# Altium PCB PCB1.PcbDoc
Units mm, origin at the board's own origin, x right, y up, seen from the top; angles counter-clockwise.
Board outline 73.75 x 80.25 mm, 2 copper layers (Top Layer, Bottom Layer); 20 components, 17 nets, 85 pads, 0 vias.
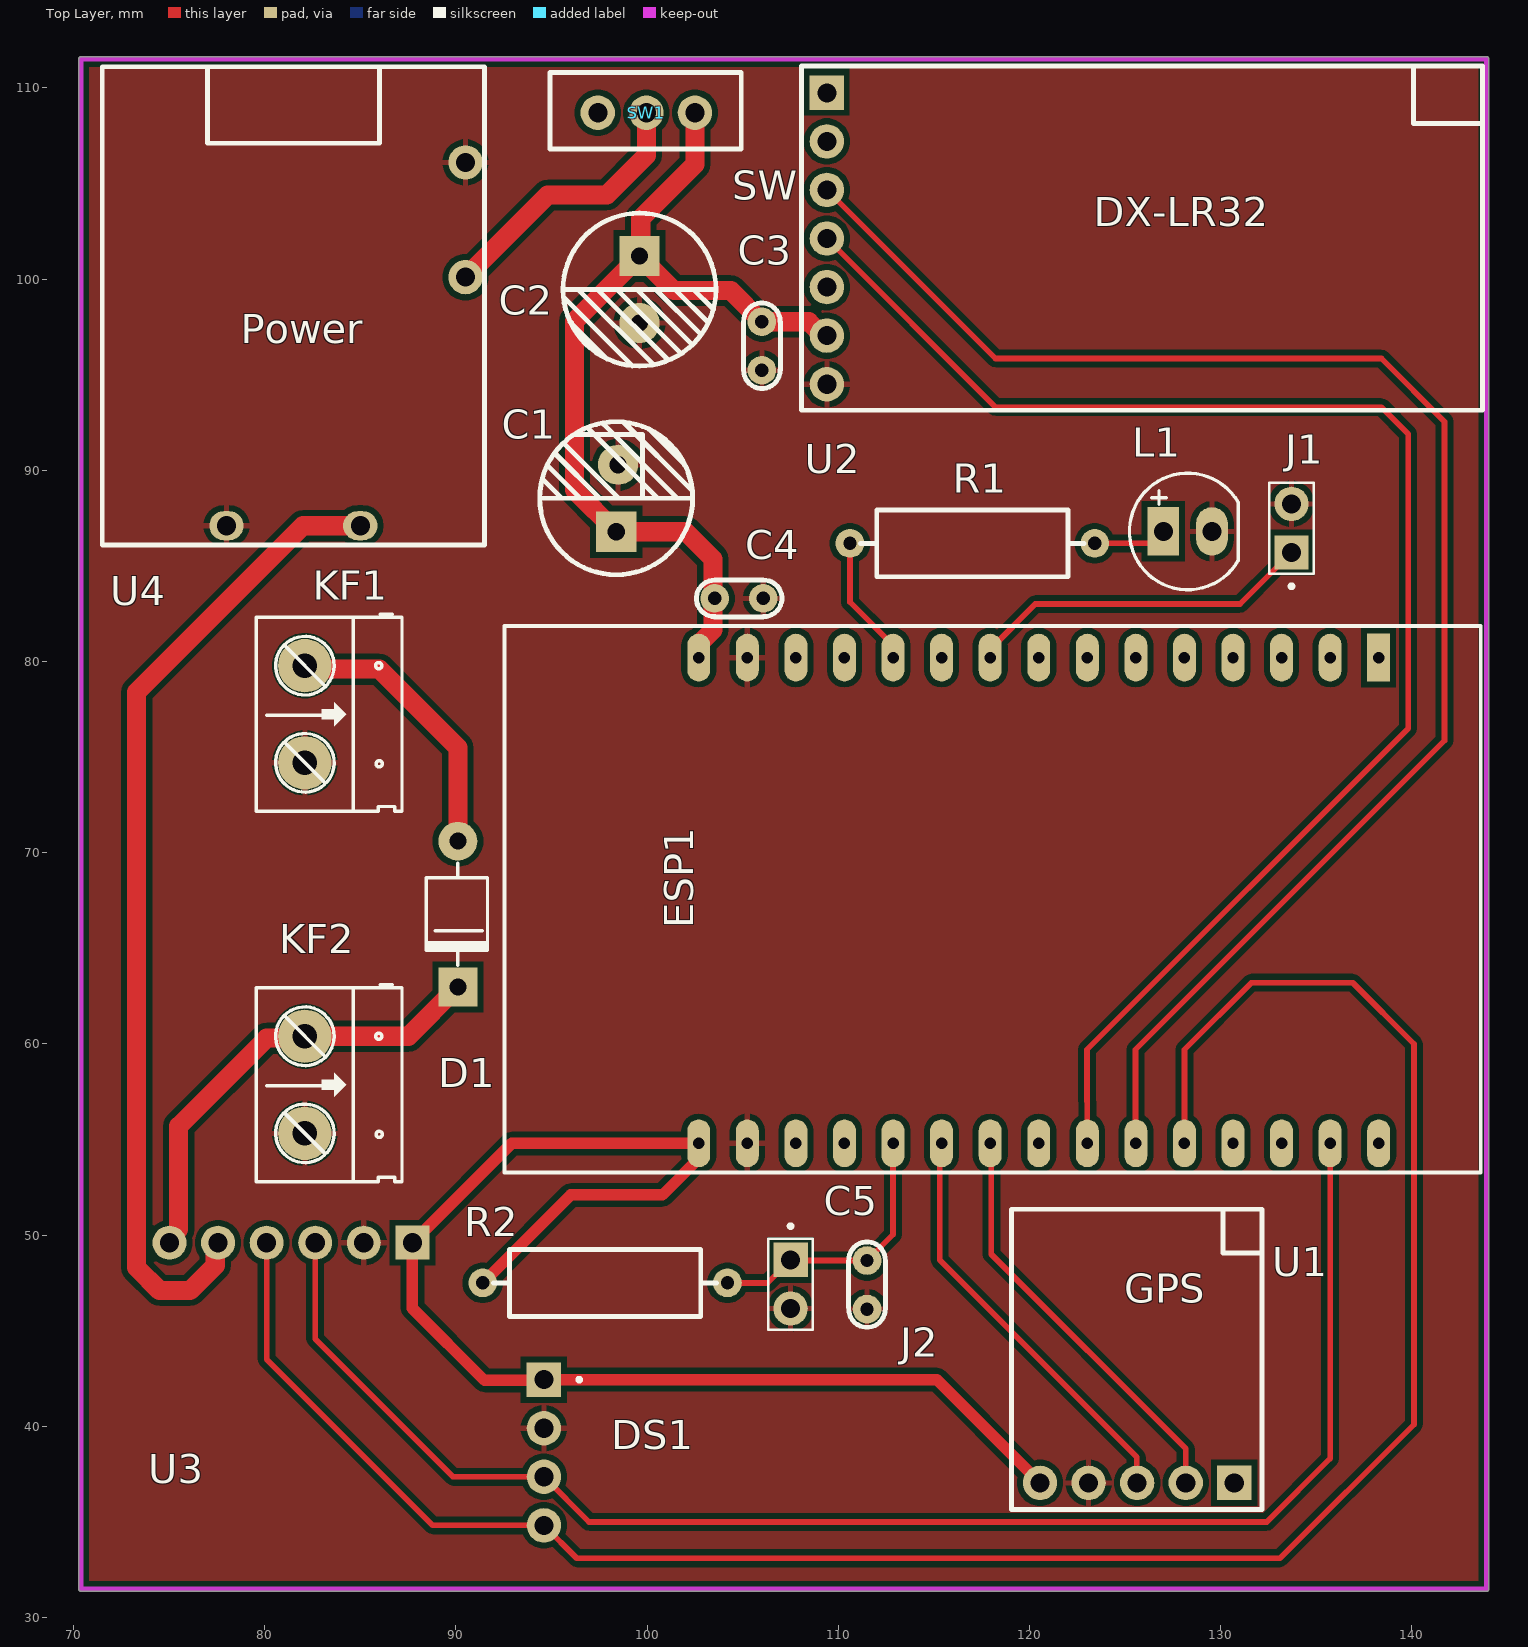
[diagram p0: Top Layer view]
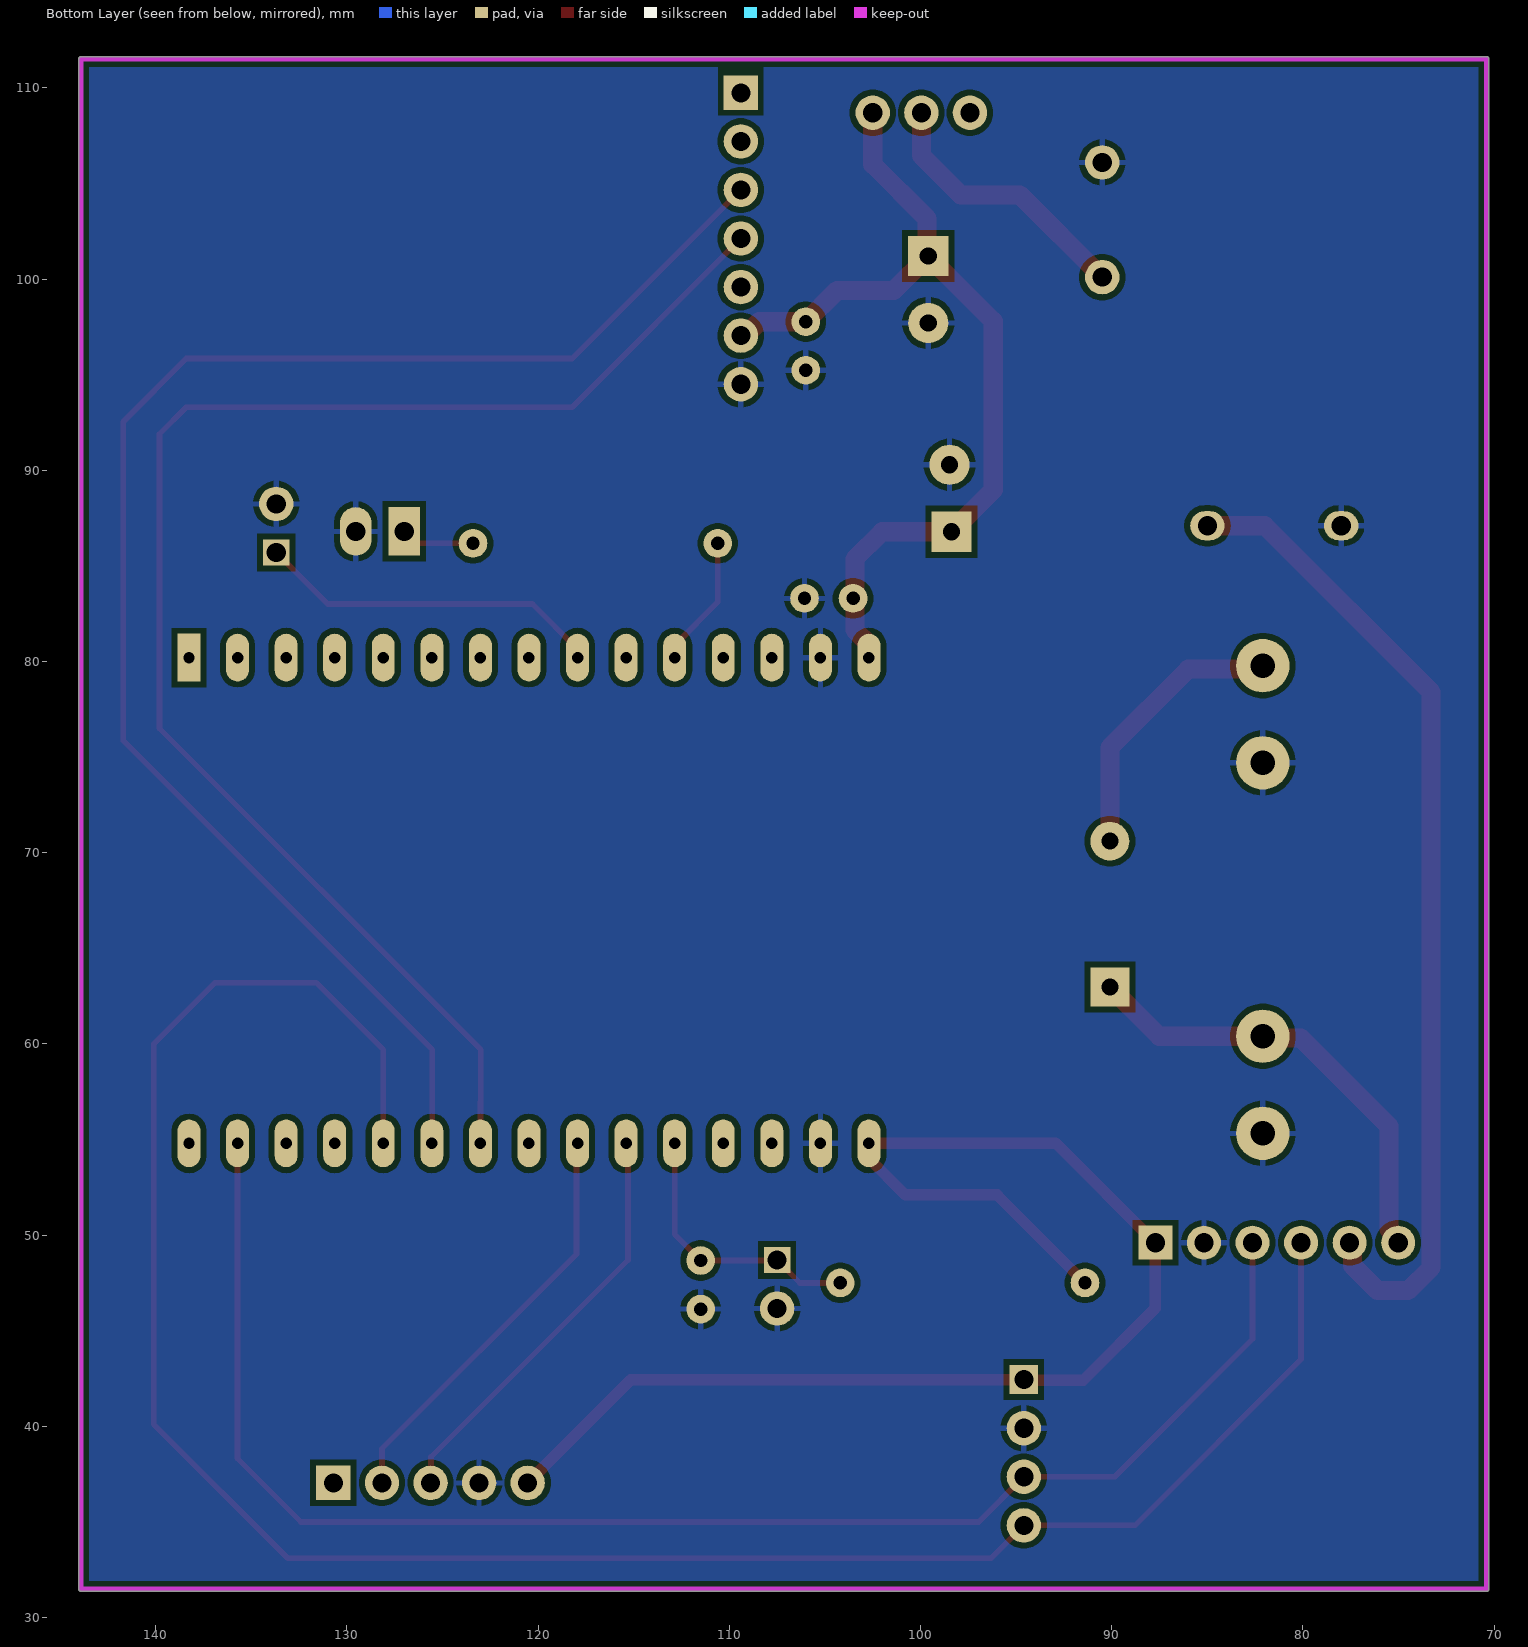
[diagram p1: Bottom Layer view, seen from below]
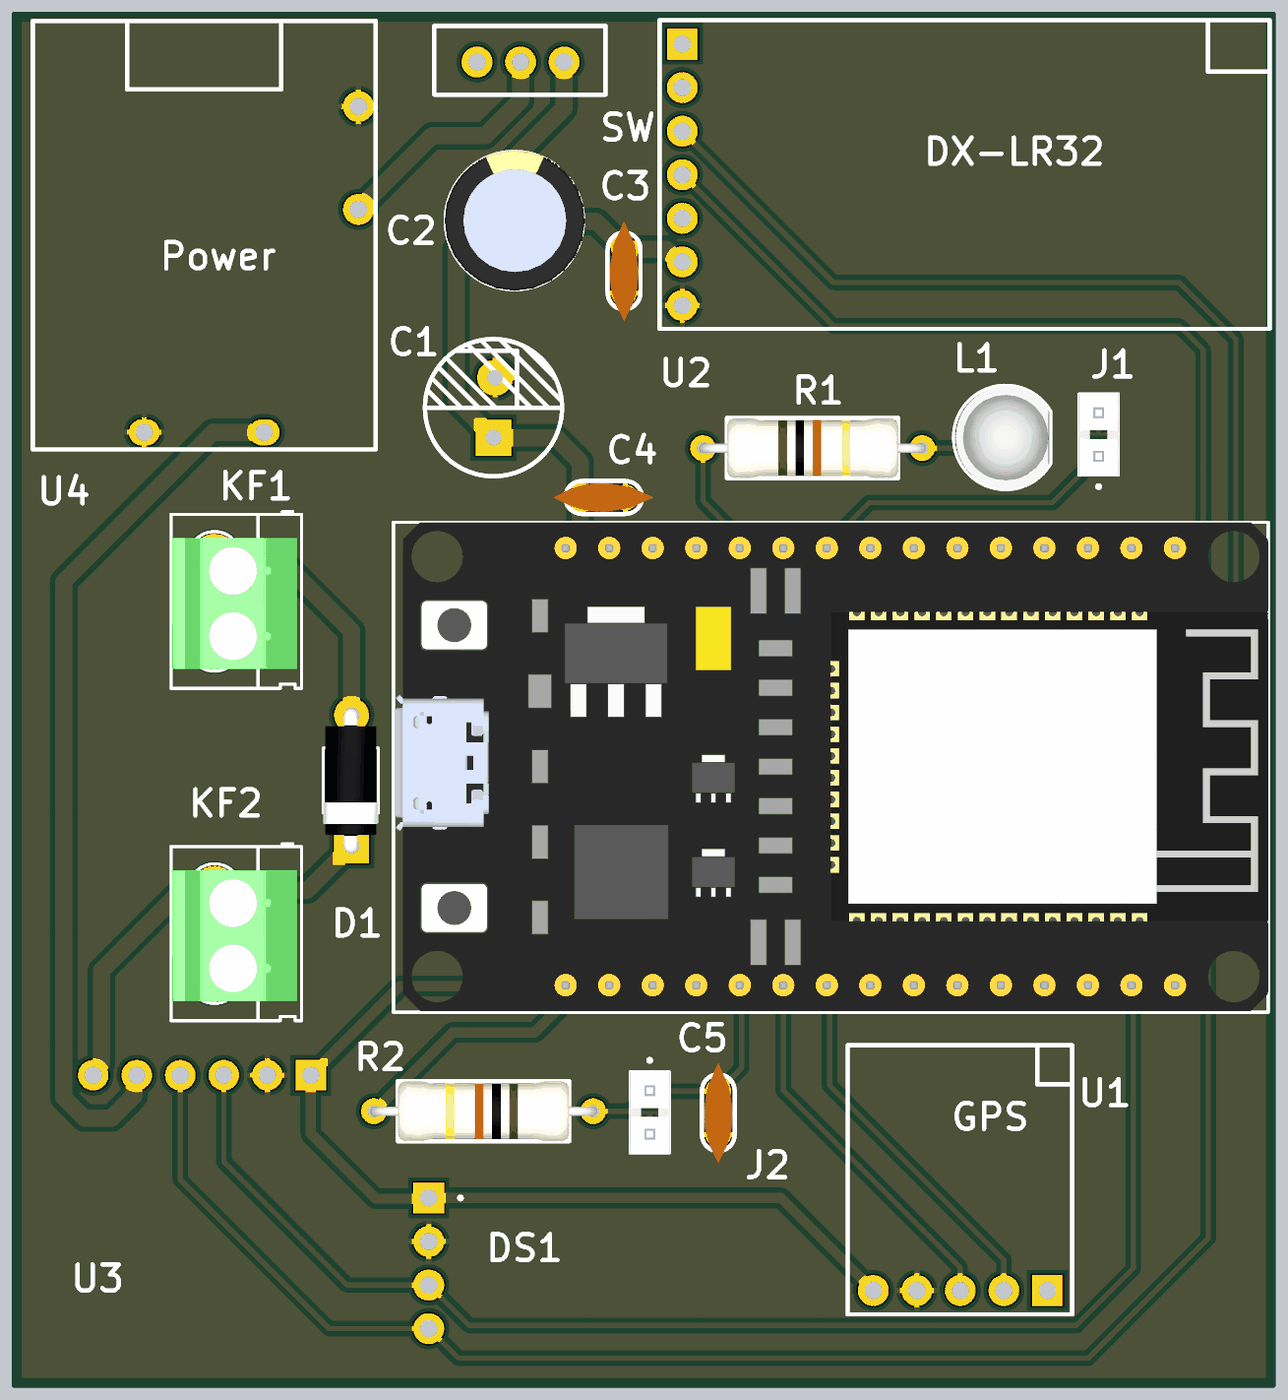
[diagram p2: 3D render of the assembled board from above, using the file's embedded part models]

## Layer stack, top to bottom
Top Solder: solder mask 0.0102, Solder Resist, Dk 3.5
Top Layer: signal copper 0.0356
Dielectric 1: dielectric 0.32, FR-4, Dk 4.8
Bottom Layer: signal copper 0.0356
Bottom Solder: solder mask 0.0102, Solder Resist, Dk 3.5

## Board outline
70.273,31.5 ccw(c70.4,31.5) 70.4,31.373 143.9,31.373 ccw(c143.9,31.5) 144.027,31.5 144.027,111.5 ccw(c143.9,111.5) 143.9,111.627 70.4,111.627 ccw(c70.4,111.5) 70.273,111.5

## Design rules (kind name [scope] priority, off if disabled: settings)
Clearance [All] p1: gap=0.3 ignorepadtopadclearanceinfootprint=FALSE
PolygonConnect [All] p1: connectstyle=Relief reliefconductorwidth=0.3 reliefentries=4 polygonreliefangle="90 Angle" airgapwidth=0.3
RoutingVias [All] p1: holewidth=0.4 width=0.8 viastyle="Through Hole" minholewidth=0.4 minwidth=0.8 maxholewidth=0.4 maxwidth=0.8
SolderMaskExpansion [All] p1: expansion=0.102 istentingtop=FALSE
Width [All] p1: maxlimit=1 minlimit=0.3 preferedwidth=0.6
30 further rules are at their usual default settings.

## Components (designator, comment, footprint, x,y, rotation, side; value= is the part's Value field where it differs from the comment)
C1 "470uF" "tu hoa 8mm"#1 98.381,88.537 r90 top
C2 "470uF" "tu hoa 8mm"#2 99.6,99.45 r270 top
C3 "104" "tu gom" 106,96.5 r270 top
C4 "104" "tu gom" 104.8,83.3 r180 top
C5 "104" "tu gom" 111.5,47.4 r270 top
D1 "1N5822" "DIODE 1A" 90.1,71.87 r90 top
DS1 "OLED_128X64_1.3_I2C" LCD_OLED_128X64_1.3_I2C 79.05,38.63 r270 top
ESP1 "ESP32 DEVKIT" "ESP32 WROOM 32 KIT" 138.26,80.2 r270 top
J1 "BUZZER" TE_3-644456-2 133.7,85.7 r90 top
J2 "BUTTON" TE_3-644456-2 107.5,48.7 r270 top
KF1 "Solar" "Con 2 KF301 5.08" 82.1,79.78 r270 top
KF2 "Battery" "Con 2 KF301 5.08" 82.1,60.4 r270 top
L1 "LED 5mm" LED-5MM-RED 127,86.8 r0 top
R1 "330R" "tro vach 1/2w" 117.007,86.178 r0 top
R2 "10k" "tro vach 1/2w" 97.8,47.5 r180 top
SW1 "SS12F15" SS12F15 94.92,106.8 r0 top
U1 "ATGM336H_GPS" ATGM336H 125.6,43.5 r0 top
U2 "DX_LR32" DX_LR32 108.079,111.137 r270 top
U3 "INA219" MODULE_INA219 81.37,41.98 r180 top
U4 "18650 Charger & Boost 5V/2A" Power_Modules 71.5,86.1 r0 top

## Footprints (in the part's own frame and the unit in brackets; to place one, negate y for a bottom-side part, rotate by r counter-clockwise, add the part's x,y. Pads: shape width x height; smd on the part's side, far side on the other; paste and mask are expansions set on the pad)
ATGM336H [mm]
  rect 1.8x1.8 hole 1: 1(5.108,-6.458)
  round 1.8 hole 1: 2(2.568,-6.458) 3(0.028,-6.458) 4(-2.512,-6.458) 5(-5.052,-6.458)
  silkscreen extent -6.55,-7.85 6.55,7.85
"Con 2 KF301 5.08" [mil]
  round 110 hole 50: 1(0,0) 2(200,0)
  silkscreen extent -106,-100 300,200, body extent -45,-97 255,190, height 335
"DIODE 1A" [mil] "Diode 1A"
  round 80 hole 35: 1(-50,0)
  rect 80x80 hole 35: 2(-350,0)
  silkscreen extent -305,-61 -95,65, body extent -366,-61 -34,65, height 122
DX_LR32 [mm]
  rect 1.8x1.8 hole 1: 1(1.397,1.321)
  round 1.8 hole 1: 2(3.937,1.321) 3(6.477,1.321) 4(9.017,1.321) 5(11.557,1.321) 6(14.097,1.321) 7(16.637,1.321)
  silkscreen extent 0,0 18,35.6
"ESP32 WROOM 32 KIT" [mm]
  rect 2.5x1.2 hole 0.6: 1(0,0)
  oval 2.5x1.2 hole 0.6: 2(0,-2.54) 3(0,-5.08) 4(0,-7.62) 5(0,-10.16) 6(0,-12.7) 7(0,-15.24) 8(0,-17.78) 9(0,-20.32) 10(0,-22.86) 11(0,-25.4) 12(0,-27.94) 13(0,-30.48) 14(0,-33.02) 15(0,-35.56) 16(25.4,-35.56) 17(25.4,-33.02) 18(25.4,-30.48) 19(25.4,-27.94) 20(25.4,-25.4) 21(25.4,-22.86) 22(25.4,-20.32) 23(25.4,-17.78) 24(25.4,-15.24) 25(25.4,-12.7) 26(25.4,-10.16) 27(25.4,-7.62) 28(25.4,-5.08) 29(25.4,-2.54) 30(25.4,0)
  silkscreen extent -1.65,-45.72 26.92,5.33, body extent -1.65,-45.6 26.85,5.33, height 10.49
LCD_OLED_128X64_1.3_I2C [mm]
  rect 1.8x1.8 / inner round 1.508 / far side rect 1.508x1.508 hole 1: 1(-3.81,15.55)
  round 1.8 hole 1: 2(-1.27,15.55) 3(1.27,15.55) 4(3.81,15.55)
  silkscreen extent -3.91,17.3 -3.71,17.5
LED-5MM-RED [mm] "LED 2 PIN, 5 ly , Only colour,pin to pin 100mil"
  rect 1.651x2.54 hole 1: 1(0,0)
  oval 1.651x2.54 hole 1: 2(2.54,0)
  silkscreen extent -1.77,-3.05 3.91,3.04, body extent -1.64,-3.02 3.78,3, height 8.62
MODULE_INA219 [mil]
  rect 70x70 / inner round 70 / far side rect 70x70 hole 39.37: 1(-250,-300)
  round 70 hole 39.37: 2(-150,-300) 3(-50,-300) 4(50,-300) 5(150,-300) 6(250,-300)
Power_Modules [mm]
  oval 1.8x1.524 hole 1: 1(13.5,1) 2(6.5,1)
  round 1.8 hole 1: 3(19,14) 4(19,20)
  silkscreen extent 0,0 20,25
SS12F15 [mm]
  round 1.8 hole 1: 1(2.5,1.9) 2(5.04,1.9) 3(7.58,1.9)
  silkscreen extent 0,0 10,4
TE_3-644456-2 [mm]
  rect 1.8x1.8 / inner round 1.37 / far side rect 1.37x1.37 hole 1: 1(0,0)
  round 1.8 hole 1: 2(2.54,0)
  silkscreen extent -1.87,-1.17 3.66,1.17, body extent -1.12,-1.17 3.66,1.17, height 10.03
"tro vach 1/2w" [mm]
  round 1.5 hole 0.7: 1(-6.4,0) 2(6.4,0)
  silkscreen extent -5.84,-1.75 5.84,1.75, body extent -6.62,-1.75 6.62,1.75, height 3.5
"tu gom" [mm] "Tu gom mini"
  round 1.5 hole 0.7: 1(-1.27,0) 2(1.27,0)
  silkscreen extent -2.25,-0.97 2.22,0.97, body extent -2.92,-0.85 2.92,0.85, height 6.12
"tu hoa 8mm"#1 [mm]
  rect 2.1x2.1 hole 0.9: 1(-1.75,0)
  round 2.1 hole 0.9: 2(1.75,-0.1)
  silkscreen extent -4,-4 4,4
"tu hoa 8mm"#2 [mm]
  rect 2.1x2.1 hole 0.9: 1(-1.75,0)
  round 2.1 hole 0.9: 2(1.75,0)
  silkscreen extent -4,-4 4,4, body extent -4.1,-4.07 4.1,4.13, height 13.81

## Part data
C1 C2: library part "Tu Hoa 470uF 16V 8x11", "Cắm", Chung_Loai=Cắm, Don_Vi=Con, Ma_Hang=MH006550, So_Chan=2, Ten_Linh_Kien="Tụ Hóa 470uF 16V 8x11MM"
C3 C4 C5: library part "Tu gom 104 50V", "Cắm", Chung_Loai=Cắm, Don_Vi=Con, Ma_Hang=MH004761, So_Chan=2, Ten_Linh_Kien="Tụ gốm 104 100nF 50V"
D1: library part "Diode 1N4007", "Cắm", Chung_Loai=Cắm, Don_Vi=Con, Ma_Hang=MH001063, Ten_Linh_Kien="Diode 1N4007 1A (DIP)"
DS1: "Non-Touch Graphic LCD Display Module Transmissive White OLED, Monochrome I2C 1.3 (33.02mm) 128 x 64", Package=None, Check_prices=https://www.snapeda.com/parts/OLED%20128x64%201.3%22%20I2C/UNIVERSAL-SOLDER+Electronics+Ltd/view-part/?ref=eda, MF="UNIVERSAL-SOLDER Electronics Ltd", MP="OLED 128x64 1.3&quot; I2C", SnapEDA_Link=https://www.snapeda.com/parts/OLED%20128x64%201.3%22%20I2C/UNIVERSAL-SOLDER+Electronics+Ltd/view-part/?ref=snap
ESP1: library part "ESP32 WROOM 32 KIT"
J1 J2: library part 3-644456-2, "HEADER ASSEMBLY, NARROW, MTA-100, 2 POSITION, STRAIGHT", Package=None, Check_prices=https://www.snapeda.com/parts/3-644456-2/TE+Connectivity+AMP+Connectors/view-part/?ref=eda, MF="TE Connectivity", MP=3-644456-2, SnapEDA_Link=https://www.snapeda.com/parts/3-644456-2/TE+Connectivity+AMP+Connectors/view-part/?ref=snap
KF1 KF2: library part "CON 2 KF301", "Cắm", Chung_Loai=Cắm, Don_Vi=Con, Ma_Hang=MH000987, Ten_Linh_Kien="CON 2 KF301-2P 5.08MM Xanh Dương"
L1: library part "LED 5mm Do", "Cắm", Chung_Loai=Cắm, Don_Vi=Con, Ma_Hang=MH008967, Ten_Linh_Kien="Led 5MM Phủ Đỏ (1000c)"
R1: library part "Tro Vach 1/2W 5% 0.22R", "Cắm", Chung_Loai=Cắm, Don_Vi=Con, Ma_Hang=MH006031, So_Chan=2, Ten_Linh_Kien="Trở 5% 1/2w 0.22R"
R2: library part "Tro Vach 1/2W 5% 10k", "Cắm", Chung_Loai=Cắm, Don_Vi=Con, Ma_Hang=MH006206, So_Chan=2, Ten_Linh_Kien="Trở 5% 1/2w 10k"
U3: "INA219 High Side DC Current Sensor Breakout - 26V Â±3.2A Max", Package="NON-STANDARD-8 ADAFRUIT", Check_prices=https://www.snapeda.com/parts/INA219%20High%20Side%20DC%20Current%20Sensor%20Breakout%20-%2026V%20%C2%B13.2A%20Max%20-%20STEMMA%20QT/Adafruit+Industries/view-part/?ref=eda, MF="Adafruit Industries", MP="INA219 High Side DC Current Sensor Breakout - 26V Â±3.2A Max - STEMMA QT", SnapEDA_Link=https://www.snapeda.com/parts/INA219%20High%20Side%20DC%20Current%20Sensor%20Breakout%20-%2026V%20%C2%B13.2A%20Max%20-%20STEMMA%20QT/Adafruit+Industries/view-part/?ref=snap
U4: library part Power_Modules, "MODULE_18650_CHARGER_BOOST"

## Nets (pads, with @x,y where several pads share a name; then routed paths per layer and width w, separated by ;. In a path a pad name is that pad's centre, name@x,y a point inside that pad or via, vN(x,y) a via of type N, cw(c..) or ccw(c..) an arc to the next point about the centre after c; other vN are vias at no path point)
3.3V_ESP: DS1.1 ESP1.16 R2.2 U1.5 U3.1 | length 72
  Top Layer w0.6: R2.2 96,52.1 100.8,52.1 102.7,54 ESP1.16 92.92,54.8 U3.1 87.72,46.18 91.5,42.4 94.56,42.4 DS1.1 115.16,42.44 120.548,37.052 U1.5
5V_BAT: SW1.2 U4.3 | length 14.3
  Top Layer w1: U4.3 94.796,104.396 97.896,104.396 99.96,106.46 SW1.2
5V_SW: C1.1 C2.1 C3.1 C4.2 ESP1.15 SW1.3 U2.6 | length 48.1
  Top Layer w1: SW1.3 102.5,106 99.664,103.164 99.664,101.264 C2.1 ; ESP1.15 102.7,80.904 103.434,81.638 103.434,83.204 C4.2 103.434,83.396 103.434,85.366 102.013,86.787 C1.1 96.2,88.968 96.2,97.8 C2.1 ; U2.6 109.184,97.04 108.454,97.77 C3.1 104.37,99.4 101.4,99.4 C2.1
BUZZER_PIN: ESP1.9 J1.1 | length 18.3
  Top Layer w0.3: ESP1.9 117.94,80.64 120.3,83 131,83 J1.1
GND: C1.2 C2.2 C3.2 C4.1 C5.2 DS1.2 ESP1.14 ESP1.17 J1.2 J2.2 KF1.2 KF2.2 L1.2 U1.4 U2.7 U3.2 U4.2 U4.4
GPS_RX: ESP1.22 U1.2 | length 22
  Top Layer w0.3: ESP1.22 118,54.74 118,49 128.168,38.832 U1.2
GPS_TX: ESP1.21 U1.3 | length 22.1
  Top Layer w0.3: ESP1.21 115.3,54.7 115.3,48.7 125.608,38.392 125.608,37.062 U1.3
I2C_SCL: DS1.3 ESP1.29 U3.3 | length 79.9
  Top Layer w0.3: U3.3 82.64,44.56 89.84,37.36 DS1.3 96.96,35 132.4,35 135.72,38.32 ESP1.29
I2C_SDA: DS1.4 ESP1.26 U3.4 | length 112.9
  Top Layer w0.3: U3.4 80.1,43.508 88.788,34.82 DS1.4 96.32,33.1 133.1,33.1 140.1,40.1 140.1,60 136.9,63.2 131.6,63.2 128.1,59.7 ESP1.26
LED_ST: ESP1.11 R1.1 | length 6.9
  Top Layer w0.3: R1.1 110.607,83.103 112.86,80.85 ESP1.11
LORA_RX: ESP1.25 U2.3 | length 81.8
  Top Layer w0.3: U2.3 118.22,95.84 138.4,95.84 141.7,92.54 141.7,75.86 125.54,59.7 125.54,54.82 ESP1.25
LORA_TX: ESP1.24 U2.4 | length 78.7
  Top Layer w0.3: U2.4 118.22,93.3 138.4,93.3 139.8,91.9 139.8,76.5 123,59.7 123,57 123.02,56.98 ESP1.24
NetD1_1: D1.1 KF1.1 | length 14.7
  Top Layer w1: KF1.1 82.28,79.6 86,79.6 90.1,75.5 D1.1
NetD1_2: D1.2 KF2.1 U3.6 | length 23.9
  Top Layer w1: U3.6 75.02,49.811 75.5,50.291 75.5,55.7 80.102,60.302 82.002,60.302 KF2.1 87.52,60.4 D1.2
NetL1_1: L1.1 R1.2 | length 3.9
  Top Layer w0.3: R1.2 126.378,86.178 L1.1
NetU3_5: U3.5 U4.1 | length 51.8
  Top Layer w1: U3.5 77.411,49.451 77.411,48.411 76.1,47.1 74.5,47.1 73.3,48.3 73.3,78.4 82,87.1 U4.1
SOS_BTN: C5.1 ESP1.20 J2.1 R2.1 | length 14.5
  Top Layer w0.3: R2.1 106.3,47.5 J2.1 107.53,48.67 C5.1 112.86,50.03 ESP1.20
pads on no net: ESP1.1 ESP1.2 ESP1.3 ESP1.4 ESP1.5 ESP1.6 ESP1.7 ESP1.8 ESP1.10 ESP1.12 ESP1.13 ESP1.18 ESP1.19 ESP1.23 ESP1.27 ESP1.28 ESP1.30 SW1.1 U1.1 U2.1 U2.2 U2.5

## Polygon pours and split planes (outlines as drawn)
GND on Top Layer "GND_L01_P003" (solid, remove dead copper, pour order 3): 70.4,111.5 70.4,31.5 143.9,31.5 143.9,111.5
GND on Bottom Layer "GND_L02_P002" (solid, remove dead copper, pour order 2): 70.4,111.5 70.4,31.5 143.9,31.5 143.9,111.5

## Keep-outs
Keep-Out Layer:
  lines w0.254: 70.4,31.5 143.9,31.5 143.9,111.5 70.4,111.5 70.4,31.5

## Text inside footprints (layer, text, board x,y; h text height)
SW1: Top Overlay "SW" at 104.454,104.154 h1.52
U1: Top Overlay "GPS" at 124.954,46.454 h1.52
U2: Top Overlay "DX-LR32" at 123.354,102.754 h1.52
U4: Top Overlay "Power" at 78.754,96.654 h1.52